# Altium PCB MergenSMPSBoardDesign.PcbDoc (part 1 of 3)
Units mm, origin at the board's own origin, x right, y up, seen from the top; angles counter-clockwise.
Board outline 115 x 90 mm, 4 copper layers (Top Layer, Layer 2, Layer 3, Bottom Layer), stack 1.527 mm thick; 83 components, 46 nets, 675 pads, 1118 vias.
Unrouted connection lines stored in the file: 1.
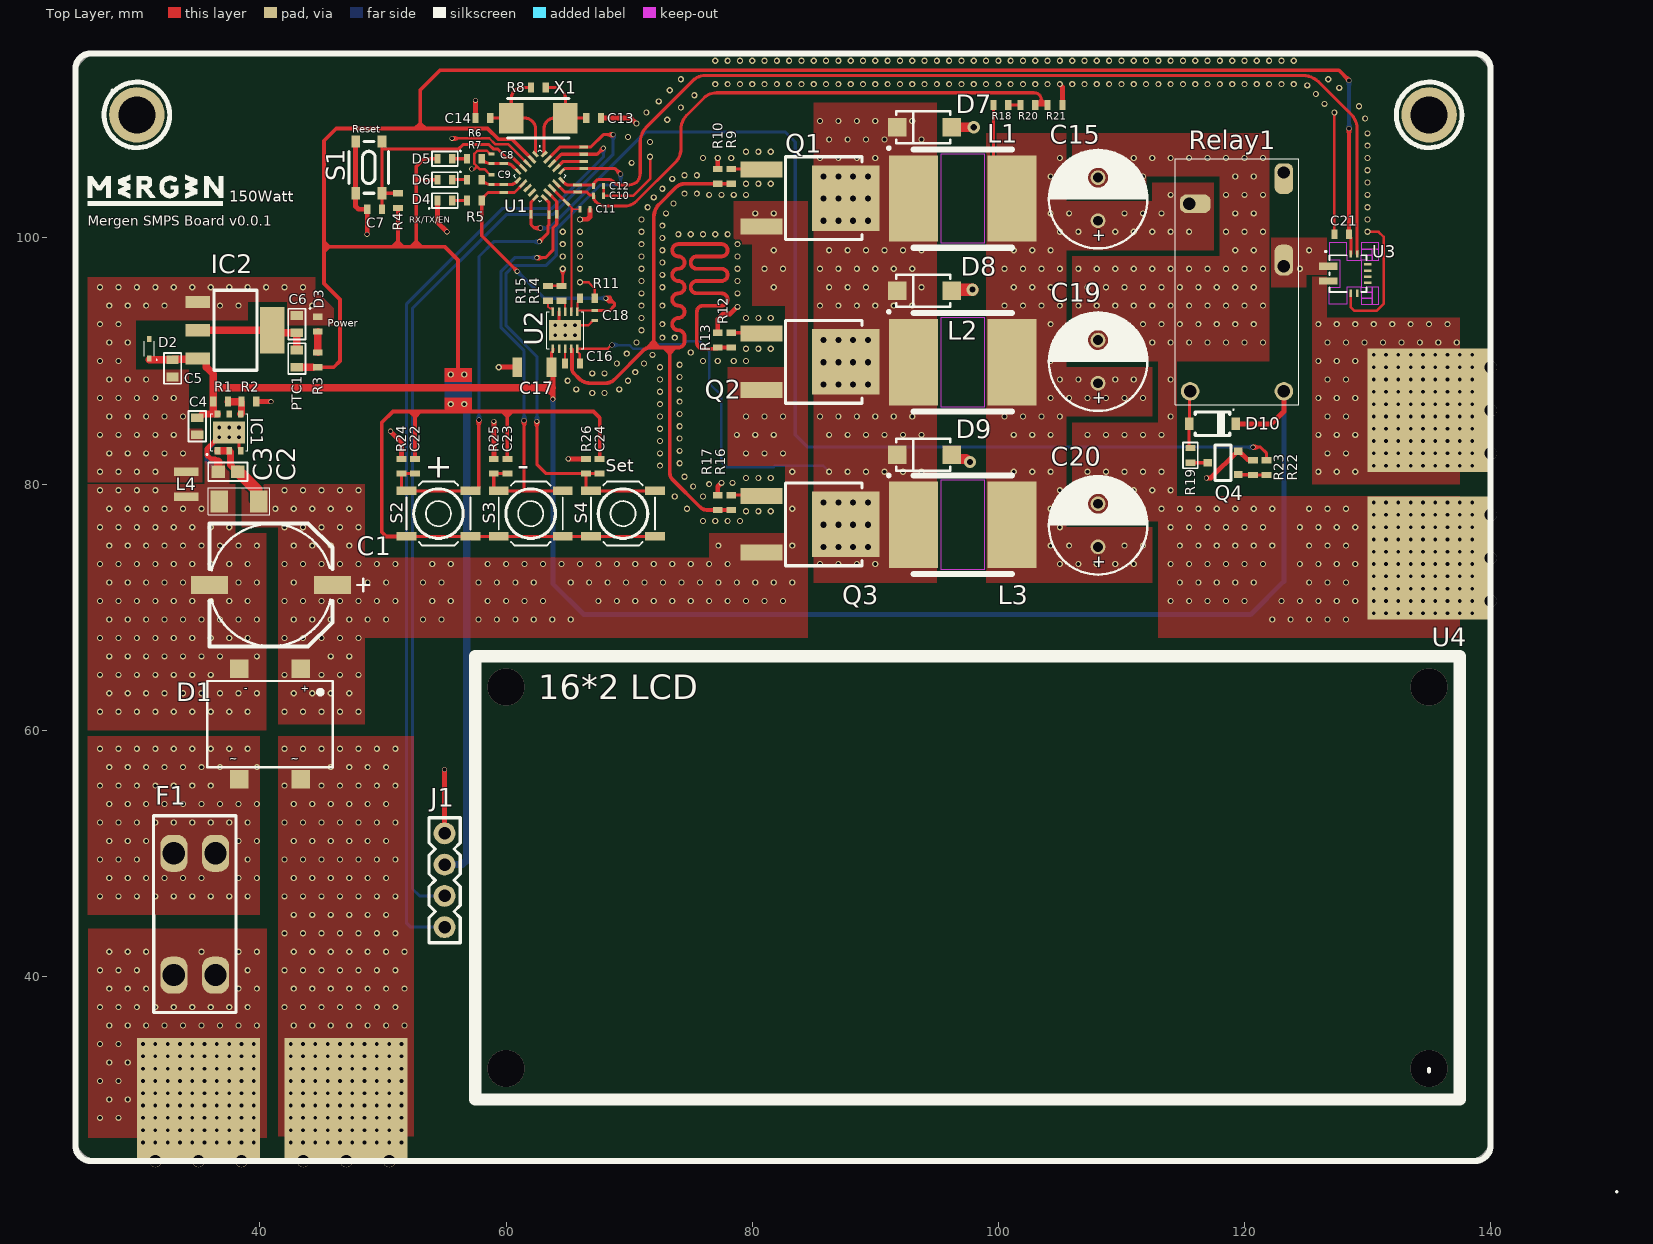
[diagram p0: Top Layer view]
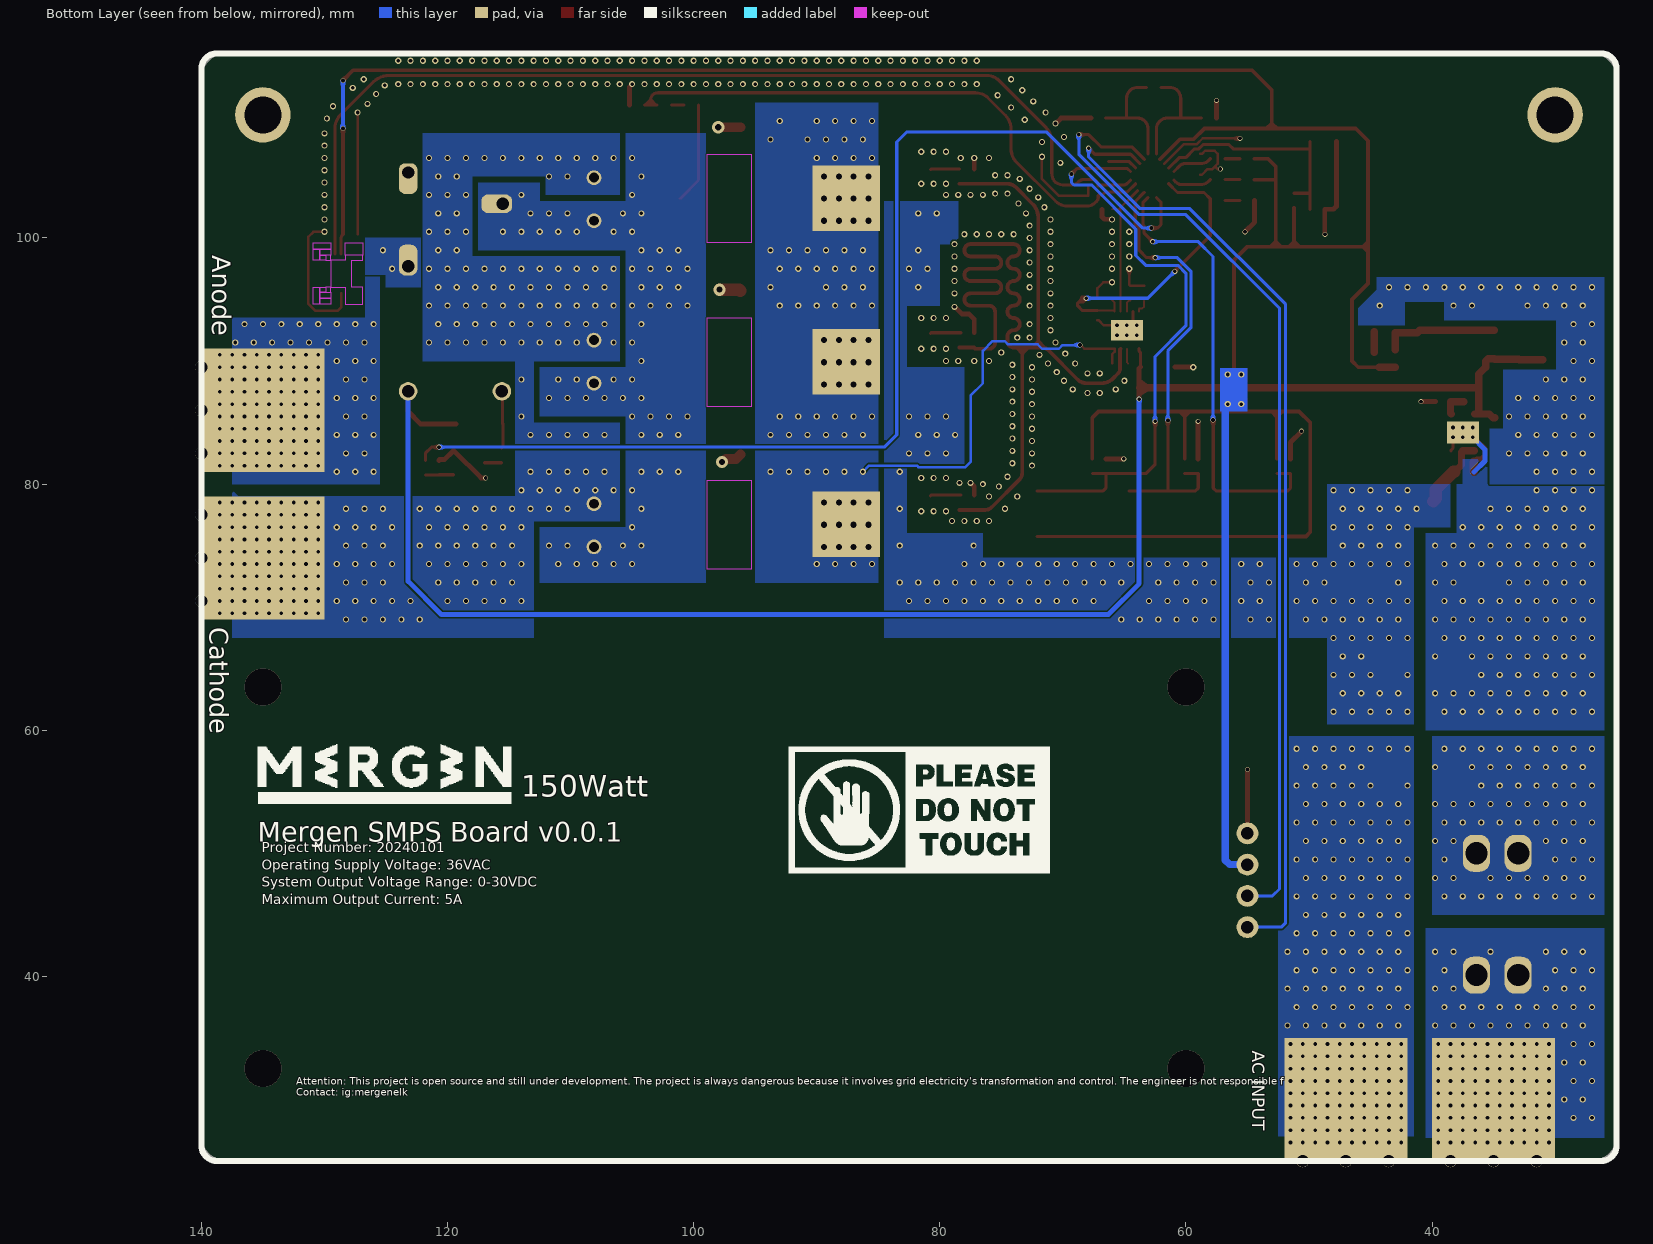
[diagram p1: Bottom Layer view, seen from below]
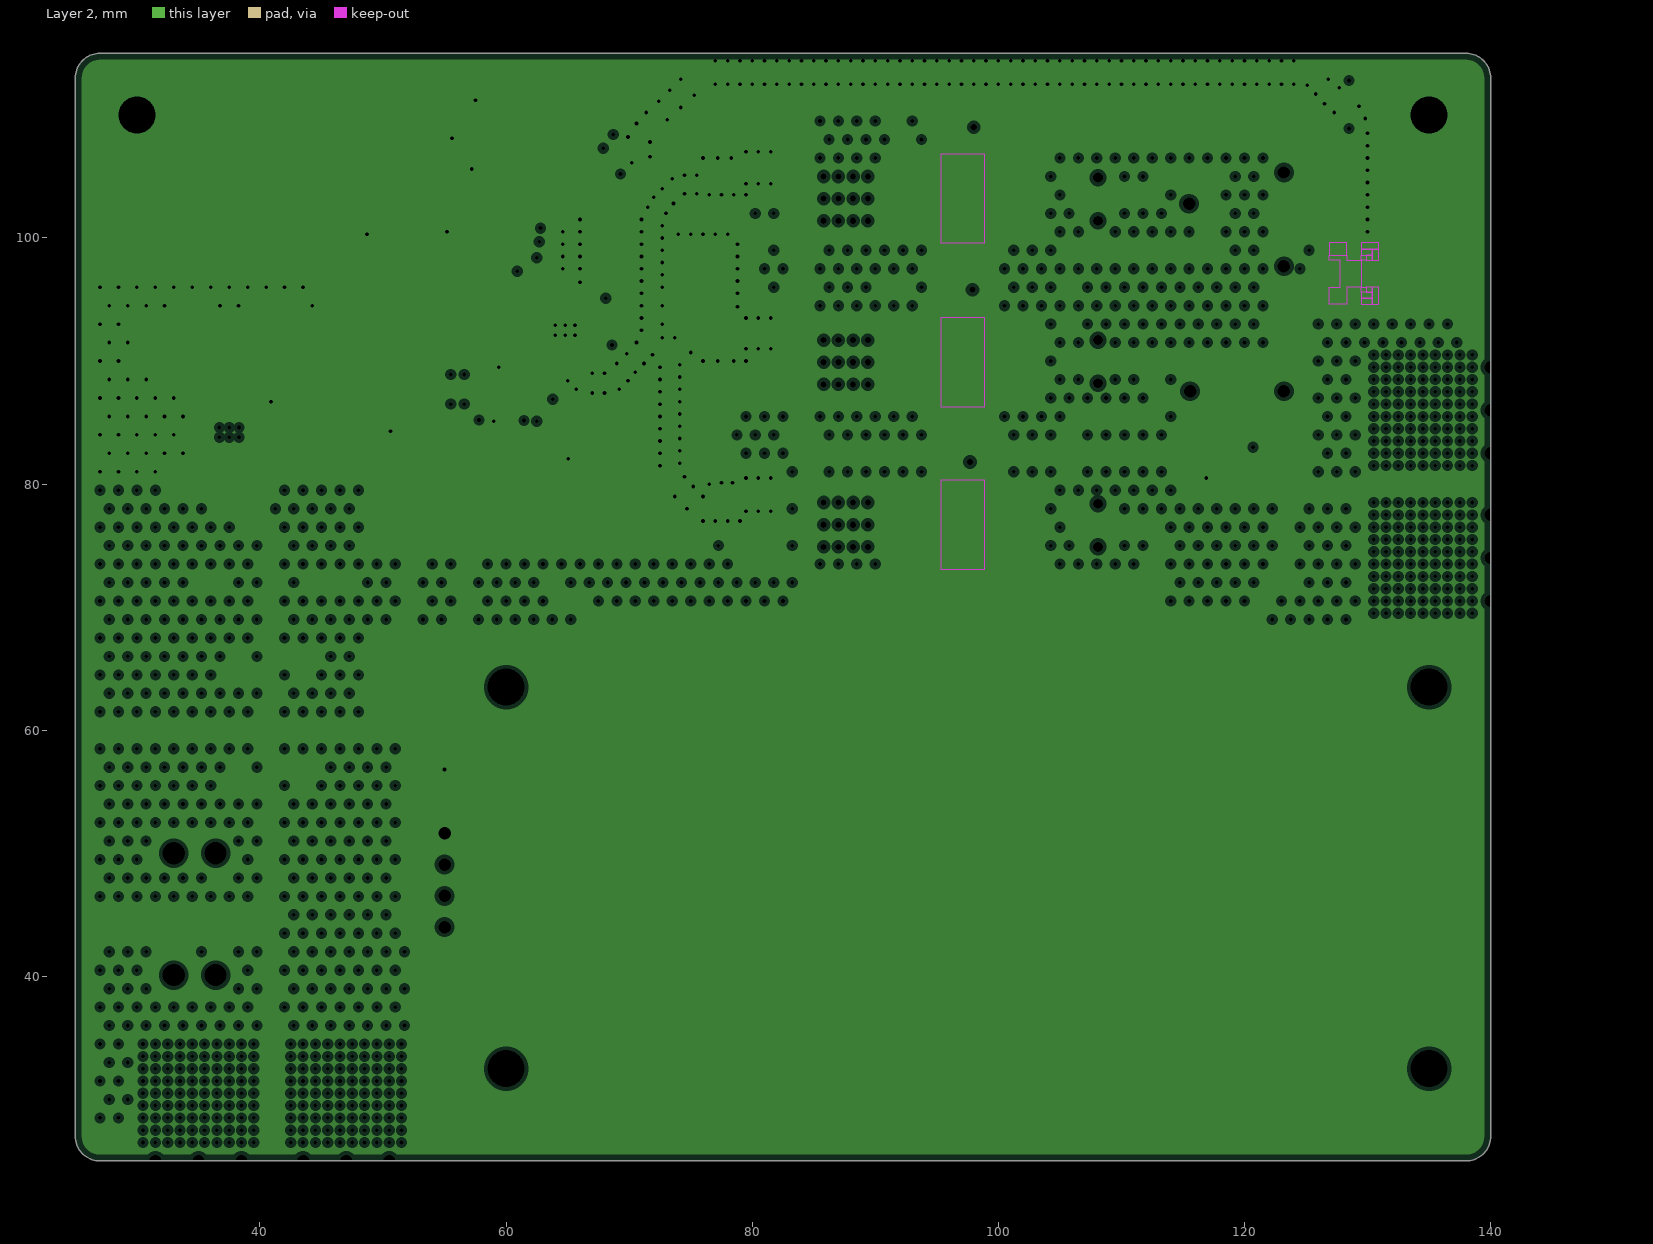
[diagram p2: Layer 2, clearances drawn from the general rule]
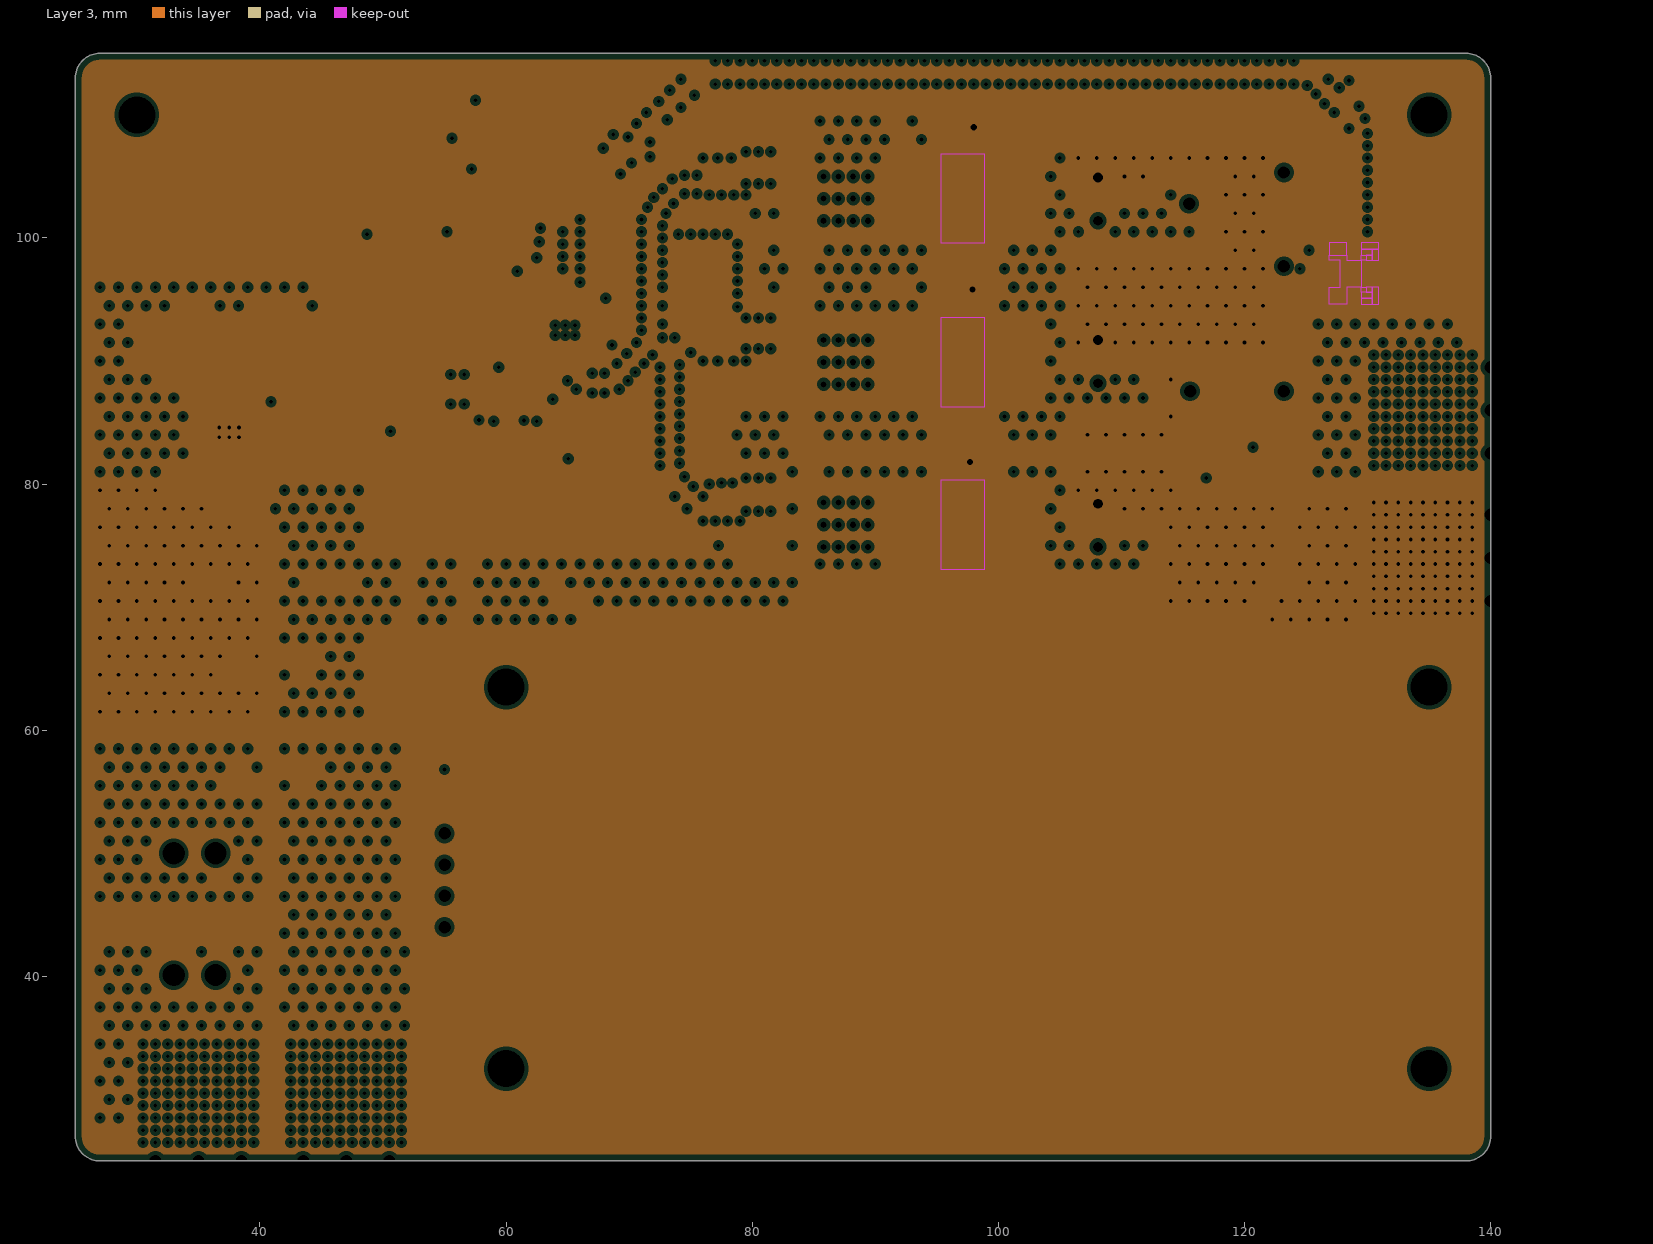
[diagram p3: Layer 3, clearances drawn from the general rule]
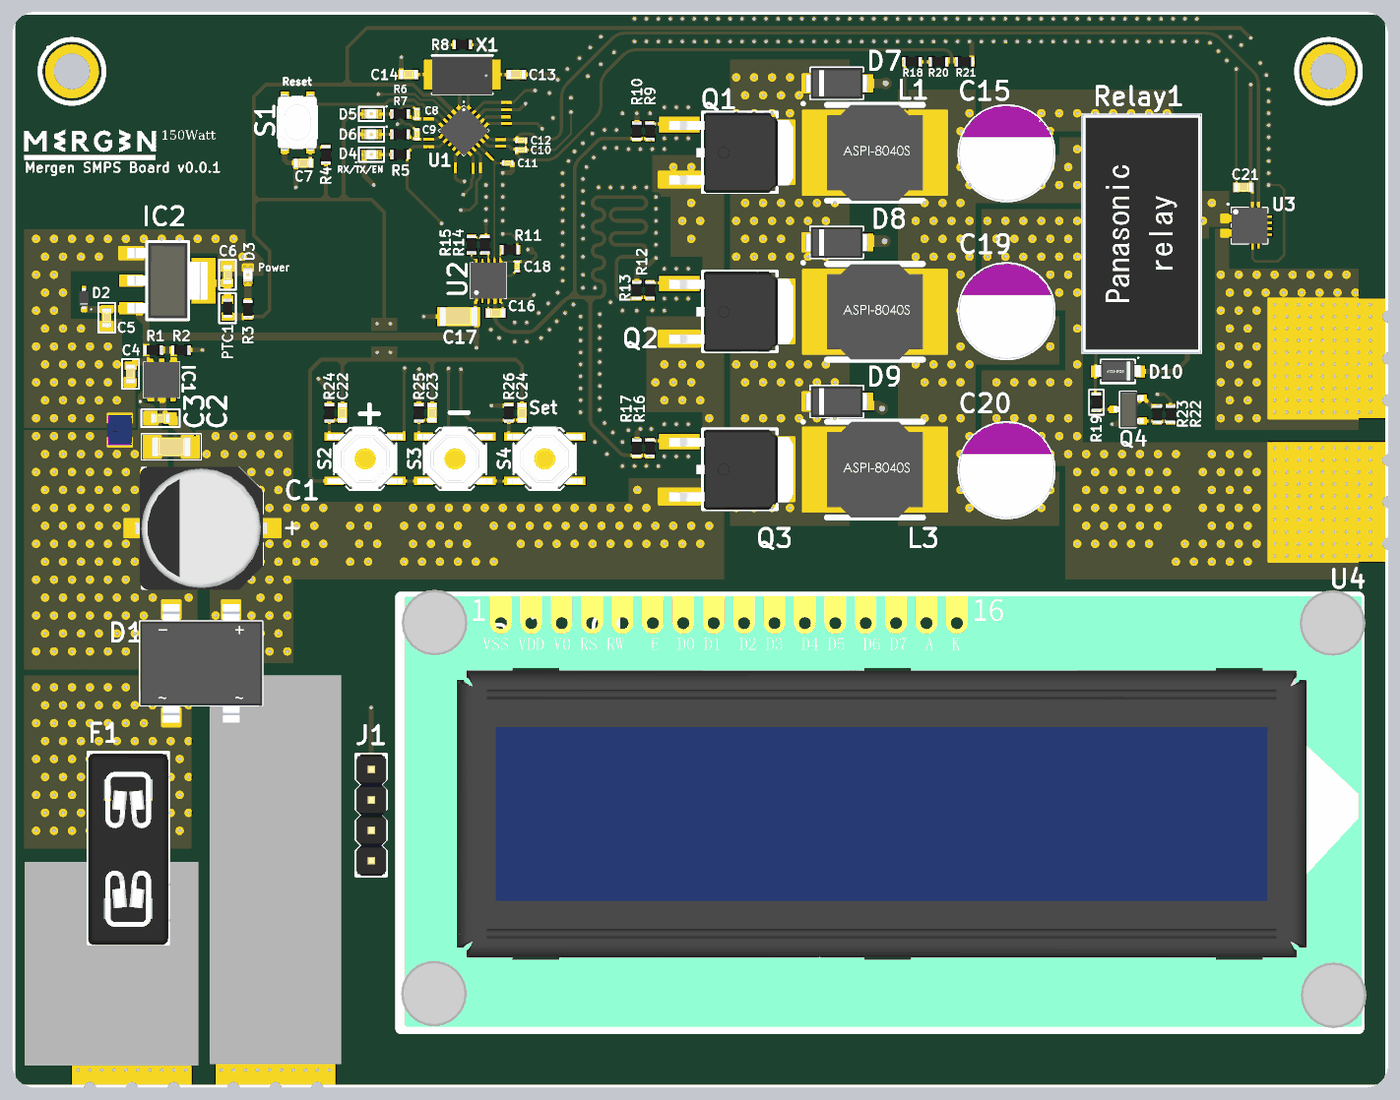
[diagram p6: 3D render of the assembled board from above, using the file's embedded part models]

## Layer stack, top to bottom
Top Solder: solder mask 0.0102, Solder Resist, Dk 3.5
Top Layer: signal copper 0.0175
Dielectric 2: prepreg 0.196, PP-006, Dk 4.1
Layer 2: plane copper 0.035, net DGND
Dielectric 1: dielectric 1.03, FR-4, Dk 4.8
Layer 3: plane copper 0.035, net PGND
Dielectric 3: prepreg 0.196, PP-006, Dk 4.1
Bottom Layer: signal copper 0.0175
Bottom Solder: solder mask 0.0102, Solder Resist, Dk 3.5

## Board outline
138,115 cw(c138,113) 140,113 140,27 cw(c138,27) 138,25 27,25 cw(c27,27) 25,27 25,113 cw(c27,113) 27,115

## Design rules (kind name [scope] priority, off if disabled: settings)
Clearance [All] p1: gap=0.152 ignorepadtopadclearanceinfootprint=TRUE except(0.102: Arc-Text Track-Text SMDPad-Text THPad-Text Via-Text Fill-Text Poly-Text Region-Text Text-Text Text-Hole)
DiffPairsRouting [All] p1: maxlimit=0.254 minlimit=0.152 mostfreqgap=0.203 toplayer_minwidth=0.152 toplayer_maxwidth=3.048 toplayer_prefwidth=0.254 bottomlayer_minwidth=0.152 bottomlayer_maxwidth=3.048 bottomlayer_prefwidth=0.254 maxuncoupledlength=12.7
HoleSize [All] p1: absolutevalues=TRUE maxlimit=6.35 minlimit=0.279 maxpercent=80.000 minpercent=20.000
HoleToHoleClearance [All] p1: gap=0.152 allowstackedmicrovias=TRUE
MinimumSolderMaskSliver MinimumSolderMaskSliver_UFQFPN20 [HasFootprint('MergenElektronik_Microcontrollers_STMicroelectronics_UFQFPN-20') vs HasFootprint('MergenElektronik_Microcontrollers_STMicroelectronics_UFQFPN-20')] p1: minsoldermaskwidth=0
MinimumSolderMaskSliver [All] p2: minsoldermaskwidth=0.076
PasteMaskExpansion [All] p1: expansion=-2539.975 usepaste=FALSE
PlaneClearance [All] p1: clearance=0.305
PlaneConnect [All] p1: planeconnectstyle=Relief reliefexpansion=0.254 reliefentries=4 reliefconductorwidth=0.254 reliefairgap=0.254
PolygonConnect PolygonConnect_49 [All vs IsNamedPolygon('CURRENT_OUT_L04_P032')] p1: connectstyle=Direct reliefconductorwidth=0.254 reliefentries=4 polygonreliefangle="90 Angle" airgapwidth=0.254
PolygonConnect PolygonConnect_48 [All vs IsNamedPolygon('RELAY_OUT_L04_P031')] p2: connectstyle=Direct reliefconductorwidth=0.254 reliefentries=4 polygonreliefangle="90 Angle" airgapwidth=0.254
PolygonConnect PolygonConnect_47 [All vs IsNamedPolygon('RELAY_OUT_L04_P031')] p3: connectstyle=Direct reliefconductorwidth=0.254 reliefentries=4 polygonreliefangle="90 Angle" airgapwidth=0.254
PolygonConnect PolygonConnect_46 [All vs IsNamedPolygon('PGND_L04_P030')] p4: connectstyle=Direct reliefconductorwidth=0.254 reliefentries=4 polygonreliefangle="90 Angle" airgapwidth=0.254
PolygonConnect PolygonConnect_45 [All vs IsNamedPolygon('PGND_L04_P029')] p5: connectstyle=Direct reliefconductorwidth=0.254 reliefentries=4 polygonreliefangle="90 Angle" airgapwidth=0.254
PolygonConnect PolygonConnect_44 [All vs IsNamedPolygon('HS_L04_P027')] p6: connectstyle=Direct reliefconductorwidth=0.254 reliefentries=4 polygonreliefangle="90 Angle" airgapwidth=0.254
PolygonConnect PolygonConnect_43 [All vs IsNamedPolygon('VCC_L04_P026')] p7: connectstyle=Direct reliefconductorwidth=0.254 reliefentries=4 polygonreliefangle="90 Angle" airgapwidth=0.254
PolygonConnect PolygonConnect_42 [All vs IsNamedPolygon('VCC_L04_P025')] p8: connectstyle=Direct reliefconductorwidth=0.254 reliefentries=4 polygonreliefangle="90 Angle" airgapwidth=0.254
PolygonConnect PolygonConnect_41 [All vs IsNamedPolygon('PGND_L04_P022')] p9: connectstyle=Direct reliefconductorwidth=0.254 reliefentries=4 polygonreliefangle="90 Angle" airgapwidth=0.254
PolygonConnect PolygonConnect_40 [All vs IsNamedPolygon('NETD1_3_L04_P021')] p10: connectstyle=Direct reliefconductorwidth=0.254 reliefentries=4 polygonreliefangle="90 Angle" airgapwidth=0.254
PolygonConnect PolygonConnect_39 [All vs IsNamedPolygon('NETD1_4_L04_P019')] p11: connectstyle=Direct reliefconductorwidth=0.254 reliefentries=4 polygonreliefangle="90 Angle" airgapwidth=0.254
PolygonConnect PolygonConnect_38 [All vs IsNamedPolygon('DGND_L04_P018')] p12: connectstyle=Direct reliefconductorwidth=0.254 reliefentries=4 polygonreliefangle="90 Angle" airgapwidth=0.254
PolygonConnect PolygonConnect_37 [All vs IsNamedPolygon('NETC15_ANOT_L04_P012')] p13: connectstyle=Direct reliefconductorwidth=0.254 reliefentries=4 polygonreliefangle="90 Angle" airgapwidth=0.254
PolygonConnect PolygonConnect_36 [All vs IsNamedPolygon('NETF1_1_L04_P003')] p14: connectstyle=Direct reliefconductorwidth=0.254 reliefentries=4 polygonreliefangle="90 Angle" airgapwidth=0.254
PolygonConnect PolygonConnect_35 [All vs IsNamedPolygon('NETD1_4_L01_P004')] p15: connectstyle=Direct reliefconductorwidth=0.254 reliefentries=4 polygonreliefangle="90 Angle" airgapwidth=0.254
PolygonConnect PolygonConnect_34 [All vs IsNamedPolygon('NETC15_ANOT_L01_P028')] p16: connectstyle=Direct reliefconductorwidth=0.254 reliefentries=4 polygonreliefangle="90 Angle" airgapwidth=0.254
PolygonConnect PolygonConnect_33 [All vs IsNamedPolygon('DGND_L01_P024')] p17: connectstyle=Direct reliefconductorwidth=0.254 reliefentries=4 polygonreliefangle="90 Angle" airgapwidth=0.254
PolygonConnect PolygonConnect_32 [All vs IsNamedPolygon('NETF1_1_L01_P020')] p18: connectstyle=Direct reliefconductorwidth=0.254 reliefentries=4 polygonreliefangle="90 Angle" airgapwidth=0.254
PolygonConnect PolygonConnect_31 [All vs IsNamedPolygon('PGND_L01_P017')] p19: connectstyle=Direct reliefconductorwidth=0.254 reliefentries=4 polygonreliefangle="90 Angle" airgapwidth=0.254
PolygonConnect PolygonConnect_30 [All vs IsNamedPolygon('CURRENT_OUT_L01_P016')] p20: connectstyle=Direct reliefconductorwidth=0.254 reliefentries=4 polygonreliefangle="90 Angle" airgapwidth=0.254
PolygonConnect PolygonConnect_29 [All vs IsNamedPolygon('RELAY_OUT_L01_P015')] p21: connectstyle=Direct reliefconductorwidth=0.254 reliefentries=4 polygonreliefangle="90 Angle" airgapwidth=0.254
PolygonConnect PolygonConnect_28 [All vs IsNamedPolygon('PGND_L01_P014')] p22: connectstyle=Direct reliefconductorwidth=0.254 reliefentries=4 polygonreliefangle="90 Angle" airgapwidth=0.254
PolygonConnect PolygonConnect_27 [All vs IsNamedPolygon('HS_L01_P011')] p23: connectstyle=Direct reliefconductorwidth=0.254 reliefentries=4 polygonreliefangle="90 Angle" airgapwidth=0.254
PolygonConnect PolygonConnect_26 [All vs IsNamedPolygon('VCC_L01_P010')] p24: connectstyle=Direct reliefconductorwidth=0.254 reliefentries=4 polygonreliefangle="90 Angle" airgapwidth=0.254
PolygonConnect PolygonConnect_25 [All vs IsNamedPolygon('VCC_L01_P009')] p25: connectstyle=Direct reliefconductorwidth=0.254 reliefentries=4 polygonreliefangle="90 Angle" airgapwidth=0.254
PolygonConnect PolygonConnect_24 [All vs IsNamedPolygon('PGND_L01_P008')] p26: connectstyle=Direct reliefconductorwidth=0.254 reliefentries=4 polygonreliefangle="90 Angle" airgapwidth=0.254
PolygonConnect PolygonConnect_23 [All vs IsNamedPolygon('NETD1_3_L01_P005')] p27: connectstyle=Direct reliefconductorwidth=0.254 reliefentries=4 polygonreliefangle="90 Angle" airgapwidth=0.254
PolygonConnect PolygonConnect_22 [All vs IsNamedPolygon('CURRENT_OUT_L01_P016')] p28: connectstyle=Direct reliefconductorwidth=0.254 reliefentries=4 polygonreliefangle="90 Angle" airgapwidth=0.254
PolygonConnect PolygonConnect_21 [All vs IsNamedPolygon('DGND_L04_P018')] p29: thpad.connectstyle=Relief thpad.reliefconductorwidth=0.6 thpad.reliefentries=4 thpad.polygonreliefangle="90 Angle" thpad.airgapwidth=0.254 smdpad.connectstyle=Relief smdpad.reliefconductorwidth=0.6 smdpad.reliefentries=4 smdpad.polygonreliefangle="90 Angle" smdpad.airgapwidth=0.254 via.connectstyle=Relief via.reliefconductorwidth=0.254 via.reliefentries=4 via.polygonreliefangle="90 Angle" via.airgapwidth=0.254
PolygonConnect PolygonConnect_20 [All vs IsNamedPolygon('PGND_L01_P017')] p30: thpad.connectstyle=Direct thpad.reliefconductorwidth=0.254 thpad.reliefentries=4 thpad.polygonreliefangle="90 Angle" thpad.airgapwidth=0.254 smdpad.connectstyle=Direct smdpad.reliefconductorwidth=0.254 smdpad.reliefentries=4 smdpad.polygonreliefangle="90 Angle" smdpad.airgapwidth=0.254 via.connectstyle=Relief via.reliefconductorwidth=0.254 via.reliefentries=4 via.polygonreliefangle="90 Angle" via.airgapwidth=0.254
PolygonConnect PolygonConnect_19 [All vs IsNamedPolygon('CURRENT_OUT_L01_P016')] p31: thpad.connectstyle=Direct thpad.reliefconductorwidth=0.254 thpad.reliefentries=4 thpad.polygonreliefangle="90 Angle" thpad.airgapwidth=0.254 smdpad.connectstyle=Direct smdpad.reliefconductorwidth=0.254 smdpad.reliefentries=4 smdpad.polygonreliefangle="90 Angle" smdpad.airgapwidth=0.254 via.connectstyle=Relief via.reliefconductorwidth=0.254 via.reliefentries=4 via.polygonreliefangle="90 Angle" via.airgapwidth=0.254
PolygonConnect PolygonConnect_18 [All vs IsNamedPolygon('RELAY_OUT_L01_P015')] p32: thpad.connectstyle=Direct thpad.reliefconductorwidth=0.254 thpad.reliefentries=4 thpad.polygonreliefangle="90 Angle" thpad.airgapwidth=0.254 smdpad.connectstyle=Direct smdpad.reliefconductorwidth=0.254 smdpad.reliefentries=4 smdpad.polygonreliefangle="90 Angle" smdpad.airgapwidth=0.254 via.connectstyle=Relief via.reliefconductorwidth=0.254 via.reliefentries=4 via.polygonreliefangle="90 Angle" via.airgapwidth=0.254
PolygonConnect PolygonConnect_17 [All vs IsNamedPolygon('PGND_L01_P014')] p33: thpad.connectstyle=Direct thpad.reliefconductorwidth=0.254 thpad.reliefentries=4 thpad.polygonreliefangle="90 Angle" thpad.airgapwidth=0.254 smdpad.connectstyle=Direct smdpad.reliefconductorwidth=0.254 smdpad.reliefentries=4 smdpad.polygonreliefangle="90 Angle" smdpad.airgapwidth=0.254 via.connectstyle=Relief via.reliefconductorwidth=0.254 via.reliefentries=4 via.polygonreliefangle="90 Angle" via.airgapwidth=0.254
PolygonConnect PolygonConnect_16 [All vs IsNamedPolygon('NETC15_ANOT_L04_P012')] p34: thpad.connectstyle=Direct thpad.reliefconductorwidth=0.254 thpad.reliefentries=4 thpad.polygonreliefangle="90 Angle" thpad.airgapwidth=0.254 smdpad.connectstyle=Direct smdpad.reliefconductorwidth=0.254 smdpad.reliefentries=4 smdpad.polygonreliefangle="90 Angle" smdpad.airgapwidth=0.254 via.connectstyle=Relief via.reliefconductorwidth=0.254 via.reliefentries=4 via.polygonreliefangle="90 Angle" via.airgapwidth=0.254
PolygonConnect PolygonConnect_15 [All vs IsNamedPolygon('HS_L01_P011')] p35: thpad.connectstyle=Direct thpad.reliefconductorwidth=0.254 thpad.reliefentries=4 thpad.polygonreliefangle="90 Angle" thpad.airgapwidth=0.254 smdpad.connectstyle=Direct smdpad.reliefconductorwidth=0.254 smdpad.reliefentries=4 smdpad.polygonreliefangle="90 Angle" smdpad.airgapwidth=0.254 via.connectstyle=Relief via.reliefconductorwidth=0.254 via.reliefentries=4 via.polygonreliefangle="90 Angle" via.airgapwidth=0.254
PolygonConnect PolygonConnect_14 [All vs IsNamedPolygon('VCC_L01_P010')] p36: thpad.connectstyle=Direct thpad.reliefconductorwidth=0.254 thpad.reliefentries=4 thpad.polygonreliefangle="90 Angle" thpad.airgapwidth=0.254 smdpad.connectstyle=Direct smdpad.reliefconductorwidth=0.254 smdpad.reliefentries=4 smdpad.polygonreliefangle="90 Angle" smdpad.airgapwidth=0.254 via.connectstyle=Relief via.reliefconductorwidth=0.254 via.reliefentries=4 via.polygonreliefangle="90 Angle" via.airgapwidth=0.254
PolygonConnect PolygonConnect_13 [All vs IsNamedPolygon('VCC_L01_P009')] p37: thpad.connectstyle=Relief thpad.reliefconductorwidth=0.6 thpad.reliefentries=4 thpad.polygonreliefangle="90 Angle" thpad.airgapwidth=0.254 smdpad.connectstyle=Relief smdpad.reliefconductorwidth=0.6 smdpad.reliefentries=4 smdpad.polygonreliefangle="90 Angle" smdpad.airgapwidth=0.254 via.connectstyle=Relief via.reliefconductorwidth=0.254 via.reliefentries=4 via.polygonreliefangle="90 Angle" via.airgapwidth=0.254
PolygonConnect PolygonConnect_12 [All vs IsNamedPolygon('PGND_L01_P008')] p38: thpad.connectstyle=Relief thpad.reliefconductorwidth=0.6 thpad.reliefentries=4 thpad.polygonreliefangle="90 Angle" thpad.airgapwidth=0.254 smdpad.connectstyle=Relief smdpad.reliefconductorwidth=0.6 smdpad.reliefentries=4 smdpad.polygonreliefangle="90 Angle" smdpad.airgapwidth=0.254 via.connectstyle=Relief via.reliefconductorwidth=0.254 via.reliefentries=4 via.polygonreliefangle="90 Angle" via.airgapwidth=0.254
PolygonConnect PolygonConnect_11 [All vs IsNamedPolygon('NETD1_3_L01_P005')] p39: thpad.connectstyle=Direct thpad.reliefconductorwidth=0.254 thpad.reliefentries=4 thpad.polygonreliefangle="90 Angle" thpad.airgapwidth=0.254 smdpad.connectstyle=Direct smdpad.reliefconductorwidth=0.254 smdpad.reliefentries=4 smdpad.polygonreliefangle="90 Angle" smdpad.airgapwidth=0.254 via.connectstyle=Relief via.reliefconductorwidth=0.254 via.reliefentries=4 via.polygonreliefangle="90 Angle" via.airgapwidth=0.254
PolygonConnect PolygonConnect_10 [All vs IsNamedPolygon('NETD1_4_L01_P004')] p40: thpad.connectstyle=Direct thpad.reliefconductorwidth=0.254 thpad.reliefentries=4 thpad.polygonreliefangle="90 Angle" thpad.airgapwidth=0.254 smdpad.connectstyle=Direct smdpad.reliefconductorwidth=0.254 smdpad.reliefentries=4 smdpad.polygonreliefangle="90 Angle" smdpad.airgapwidth=0.254 via.connectstyle=Relief via.reliefconductorwidth=0.254 via.reliefentries=4 via.polygonreliefangle="90 Angle" via.airgapwidth=0.254
PolygonConnect PolygonConnect_9 [All vs IsNamedPolygon('CURRENT_OUT_L01_P016')] p41: thpad.connectstyle=Direct thpad.reliefconductorwidth=0.254 thpad.reliefentries=4 thpad.polygonreliefangle="90 Angle" thpad.airgapwidth=0.254 smdpad.connectstyle=Direct smdpad.reliefconductorwidth=0.254 smdpad.reliefentries=4 smdpad.polygonreliefangle="90 Angle" smdpad.airgapwidth=0.254 via.connectstyle=Relief via.reliefconductorwidth=0.254 via.reliefentries=4 via.polygonreliefangle="90 Angle" via.airgapwidth=0.254
PolygonConnect PolygonConnect_8 [All vs IsNamedPolygon('NETF1_1_L04_P003')] p42: thpad.connectstyle=Relief thpad.reliefconductorwidth=1 thpad.reliefentries=4 thpad.polygonreliefangle="90 Angle" thpad.airgapwidth=0.254 smdpad.connectstyle=Relief smdpad.reliefconductorwidth=1 smdpad.reliefentries=4 smdpad.polygonreliefangle="90 Angle" smdpad.airgapwidth=0.254 via.connectstyle=Relief via.reliefconductorwidth=0.254 via.reliefentries=4 via.polygonreliefangle="90 Angle" via.airgapwidth=0.254
PolygonConnect PolygonConnect_7 [All vs IsNamedPolygon('NETD1_4_L01_P004')] p43: thpad.connectstyle=Relief thpad.reliefconductorwidth=1 thpad.reliefentries=4 thpad.polygonreliefangle="90 Angle" thpad.airgapwidth=0.254 smdpad.connectstyle=Relief smdpad.reliefconductorwidth=1 smdpad.reliefentries=4 smdpad.polygonreliefangle="90 Angle" smdpad.airgapwidth=0.254 via.connectstyle=Relief via.reliefconductorwidth=0.254 via.reliefentries=4 via.polygonreliefangle="90 Angle" via.airgapwidth=0.254
PolygonConnect PolygonConnect_6 [All vs IsNamedPolygon('NETD1_3_L01_P005')] p44: thpad.connectstyle=Relief thpad.reliefconductorwidth=1 thpad.reliefentries=4 thpad.polygonreliefangle="90 Angle" thpad.airgapwidth=0.254 smdpad.connectstyle=Relief smdpad.reliefconductorwidth=1 smdpad.reliefentries=4 smdpad.polygonreliefangle="90 Angle" smdpad.airgapwidth=0.254 via.connectstyle=Relief via.reliefconductorwidth=0.254 via.reliefentries=4 via.polygonreliefangle="90 Angle" via.airgapwidth=0.254
PolygonConnect PolygonConnect_5 [All vs IsNamedPolygon('VCC_L01_P009')] p45: thpad.connectstyle=Relief thpad.reliefconductorwidth=0.4 thpad.reliefentries=4 thpad.polygonreliefangle="90 Angle" thpad.airgapwidth=0.254 smdpad.connectstyle=Relief smdpad.reliefconductorwidth=0.4 smdpad.reliefentries=4 smdpad.polygonreliefangle="90 Angle" smdpad.airgapwidth=0.254 via.connectstyle=Relief via.reliefconductorwidth=0.254 via.reliefentries=4 via.polygonreliefangle="90 Angle" via.airgapwidth=0.254
PolygonConnect PolygonConnect_4 [All vs IsNamedPolygon('PGND_L01_P008')] p46: thpad.connectstyle=Relief thpad.reliefconductorwidth=0.4 thpad.reliefentries=4 thpad.polygonreliefangle="90 Angle" thpad.airgapwidth=0.254 smdpad.connectstyle=Relief smdpad.reliefconductorwidth=0.4 smdpad.reliefentries=4 smdpad.polygonreliefangle="90 Angle" smdpad.airgapwidth=0.254 via.connectstyle=Relief via.reliefconductorwidth=0.254 via.reliefentries=4 via.polygonreliefangle="90 Angle" via.airgapwidth=0.254
PolygonConnect PolygonConnect_3 [All vs IsNamedPolygon('NETD1_3_L01_P005')] p47: thpad.connectstyle=Relief thpad.reliefconductorwidth=0.6 thpad.reliefentries=4 thpad.polygonreliefangle="90 Angle" thpad.airgapwidth=0.254 smdpad.connectstyle=Relief smdpad.reliefconductorwidth=0.6 smdpad.reliefentries=4 smdpad.polygonreliefangle="90 Angle" smdpad.airgapwidth=0.254 via.connectstyle=Relief via.reliefconductorwidth=0.254 via.reliefentries=4 via.polygonreliefangle="90 Angle" via.airgapwidth=0.254
PolygonConnect PolygonConnect_2 [All vs IsNamedPolygon('NETD1_4_L01_P004')] p48: thpad.connectstyle=Relief thpad.reliefconductorwidth=0.6 thpad.reliefentries=4 thpad.polygonreliefangle="90 Angle" thpad.airgapwidth=0.254 smdpad.connectstyle=Relief smdpad.reliefconductorwidth=0.6 smdpad.reliefentries=4 smdpad.polygonreliefangle="90 Angle" smdpad.airgapwidth=0.254 via.connectstyle=Relief via.reliefconductorwidth=0.254 via.reliefentries=4 via.polygonreliefangle="90 Angle" via.airgapwidth=0.254
PolygonConnect PolygonConnect_1 [All vs IsNamedPolygon('NETF1_1_L04_P003')] p49: thpad.connectstyle=Relief thpad.reliefconductorwidth=0.6 thpad.reliefentries=4 thpad.polygonreliefangle="90 Angle" thpad.airgapwidth=0.254 smdpad.connectstyle=Relief smdpad.reliefconductorwidth=0.6 smdpad.reliefentries=4 smdpad.polygonreliefangle="90 Angle" smdpad.airgapwidth=0.254 via.connectstyle=Relief via.reliefconductorwidth=0.254 via.reliefentries=4 via.polygonreliefangle="90 Angle" via.airgapwidth=0.254
PolygonConnect [All] p50: connectstyle=Relief reliefconductorwidth=0.254 reliefentries=4 polygonreliefangle="90 Angle" airgapwidth=0.254
RoutingCorners [All] p1: cornerstyle=45-Degree minsetback=1.016 maxsetback=1.016
RoutingTopology [All] p1: topology=Daisy_Balanced
RoutingVias [All] p1: holewidth=0.305 width=0.406 viastyle="Through Hole" minholewidth=0.279 minwidth=0.406 maxholewidth=6.35 maxwidth=8.128
SilkToSilkClearance [All] p1: silktosilkclearance=0.076
SilkToSolderMaskClearance [IsPad] p1: minsilkscreentomaskgap=0.076 clearancetoexposedcopper=TRUE
SolderMaskExpansion [All] p1: expansion=0.102 istentingtop=FALSE
SupplyNets "Schematic Supply Nets_6" [InNet('PGND')] p1: voltage=0.000
SupplyNets "Schematic Supply Nets_5" [InNet('3.3V')] p2: voltage=0.000
SupplyNets "Schematic Supply Nets_4" [InNet('USB5V')] p3: voltage=0.000
SupplyNets "Schematic Supply Nets_3" [InNet('DGND')] p4: voltage=0.000
SupplyNets "Schematic Supply Nets_2" [InNet('7.5V')] p5: voltage=0.000
SupplyNets "Schematic Supply Nets_1" [InNet('VCC')] p6: voltage=0.000
Width [All] p1: maxlimit=5.08 minlimit=0.152 preferedwidth=0.254 minimp=50.000000 maximp=50.000000 favimp=50.000000
19 further rules are at their usual default settings.

## Classes and differential pairs
component class PowerDistribution: C1 C2 C3 C4 C5 C6 D1 D2 D3 F1 IC1 IC2 L4 PTC1 R1 R2 R3
component class MicroController: C7 C8 C9 C10 C11 C12 C13 C14 D4 D5 D6 R4 R5 R6 R7 R8 S1 U1 X1
component class Measuring: C21 D10 Q4 R18 R19 R20 R21 R22 R23 Relay1 U3
component class GateDriverandMosfets: C15 C16 C17 C18 C19 C20 D7 D8 D9 L1 L2 L3 Q1 Q2 Q3 R9 R10 R11 R12 R13 R14 R15 R16 R17 U2
component class Control: C22 C23 C24 J1 R24 R25 R26 S2 S3 S4 U4

## Components (designator, comment, footprint, x,y, rotation, side; value= is the part's Value field where it differs from the comment)
C1 "100 µF" MergenElektronik_Capacitors_AluminumElectrolytics_SMDs_10x10.5mm 35.9,66.8 r0 top
C2 "0.33 µF" MergenElektronik_Capacitors_Ceramics_SMDs_1206_L 39.9,79.4 r180 top
C3 "10 nF" MergenElektronik_Capacitors_Ceramics_SMDs_0603_L 37.4,81 r180 top
C4 "100 nF" MergenElektronik_Capacitors_Ceramics_SMDs_0603_M 34.9,84.7 r270 top
C5 "100 nF" MergenElektronik_Capacitors_Ceramics_SMDs_0603_M 32.9,89.4 r270 top
C6 "100 nF" MergenElektronik_Capacitors_Ceramics_SMDs_0603_M 43,93 r90 top
C7 "100 nF" MergenElektronik_Capacitors_Ceramics_SMDs_0603_S_NS 49.318,102.336 r180 top
C8 "50 pF" MergenElektronik_Capacitors_Ceramics_SMDs_0402_S_NS 58.818,106.436 r90 top
C9 "50 pF" MergenElektronik_Capacitors_Ceramics_SMDs_0402_S_NS 58.818,104.736 r90 top
C10 "50 pF" MergenElektronik_Capacitors_Ceramics_SMDs_0402_S_NS 67.518,103.436 r0 top
C11 "50 pF" MergenElektronik_Capacitors_Ceramics_SMDs_0402_S_NS 66.418,102.336 r0 top
C12 "50 pF" MergenElektronik_Capacitors_Ceramics_SMDs_0402_S_NS 67.518,104.236 r0 top
C13 "8 pF" MergenElektronik_Capacitors_Ceramics_SMDs_0603_S_NS 67.118,109.736 r0 top
C14 "8 pF" MergenElektronik_Capacitors_Ceramics_SMDs_0603_S_NS 58.118,109.736 r180 top
C15 "18 µF" MERGENELEKTRONIK_CAPACITORS_ALUMINUMELECTROLYTICS_THTS_8X7MM 112.1,99.15 r90 top
C16 "100 nF" MergenElektronik_Capacitors_Ceramics_SMDs_0603_S_NS 65.4,89.8 r0 top
C17 "1 µF" MergenElektronik_Capacitors_Ceramics_SMDs_1206_S_NS 63.9,90.3 r180 top
C18 "1 nF" MergenElektronik_Capacitors_Ceramics_SMDs_0402_S_NS 67.2,93.7 r270 top
C19 "18 µF" MERGENELEKTRONIK_CAPACITORS_ALUMINUMELECTROLYTICS_THTS_8X7MM 112.1,85.95 r90 top
C20 "18 µF" MERGENELEKTRONIK_CAPACITORS_ALUMINUMELECTROLYTICS_THTS_8X7MM 112.1,72.65 r90 top
C21 "100 nF" MergenElektronik_Capacitors_Ceramics_SMDs_0603_S_NS 127.9,100.3 r180 top
C22 "100 nF" MergenElektronik_Capacitors_Ceramics_SMDs_0603_S_NS 52.6,81.45 r270 top
C23 "100 nF" MergenElektronik_Capacitors_Ceramics_SMDs_0603_S_NS 60.1,81.45 r270 top
C24 "100 nF" MergenElektronik_Capacitors_Ceramics_SMDs_0603_S_NS 67.6,81.45 r270 top
D1 "TBS606" MergenElektronik_Diodes_BridgeRectifiers_TBS606 35.7,57 r0 top
D2 "BAT54XV2T1G" MergenElektronik_Diodes_SchottkyDiodes_SOD-523 30.6,91.6 r270 top value=VSSB7L45-M3/52T
D3 "Red" MergenElektronik_Leds_SMDs_0603_S_NS 44.7,93 r90 top
D4 "Red" MergenElektronik_Leds_SMDs_0603_S 55.018,103.036 r180 top
D5 "Green" MergenElektronik_Leds_SMDs_0603_S 55.018,106.436 r0 top
D6 "Green" MergenElektronik_Leds_SMDs_0603_S 55.018,104.736 r0 top
D7 "SL310A-TP" "MergenElektronik_Diodes_SchottkyDiodes_DO-214AC (SMA)" 96.1,110.3 r180 top value=VSSB7L45-M3/52T
D8 "SL310A-TP" "MergenElektronik_Diodes_SchottkyDiodes_DO-214AC (SMA)" 96.1,97 r180 top value=VSSB7L45-M3/52T
D9 "SL310A-TP" "MergenElektronik_Diodes_SchottkyDiodes_DO-214AC (SMA)" 96.1,83.7 r180 top value=VSSB7L45-M3/52T
D10 "1N4007FL" MergenElektronik_Diodes_SingleDiodes_SOD-123F 116,83.95 r0 top
F1 "3568" MergenElektronik_FuseHolders_BladeType_3568 38.065,37.05 r90 top
IC1 "MAX5084ATT+T" MergenElektronik_Regulators_Linears_6-TDFN 39,82.7 r90 top
IC2 "NCP1117 - 3v3" MergenElektronik_Regulators_Linears_SOT223 36.25,95.75 r270 top value=NCP1117ST33T3G
J1 "1x4" MergenElektronik_Connectors_Headers_1x4_Male 55,44 r90 top
L1 "75 µH" MergenElektronik_Inductors_PowerInductors_SMDs_8x8x4mm_Shielded 93.1,99.2 r0 top
L2 "75 µH" MergenElektronik_Inductors_PowerInductors_SMDs_8x8x4mm_Shielded 93.1,85.9 r0 top
L3 "75 µH" MergenElektronik_Inductors_PowerInductors_SMDs_8x8x4mm_Shielded 93.1,72.7 r0 top
L4 "2.2  µH" MergenElektronik_Inductors_PowerInductors_SMDs_1008_S_NS 34,80 r90 top
PTC1 "0ZCK0020FF2G" MergenElektronik_CircuitProtections_PTCs_0603_M 43,90.2 r270 top
Q1 "DMN10H220LK3-13" MergenElektronik_Transistors_Mosfets_TO-252-3(DPAK) 82.7,106.6 r270 top
Q2 "DMN10H220LK3-13" MergenElektronik_Transistors_Mosfets_TO-252-3(DPAK) 82.7,93.3 r270 top
Q3 "DMN10H220LK3-13" MergenElektronik_Transistors_Mosfets_TO-252-3(DPAK) 82.7,80.1 r270 top
Q4 "BSS138LT1G" MergenElektronik_Transistors_Mosfets_SOT-23 118.9,80.283 r90 top
R1 "10K" MergenElektronik_Resistors_ChipResistors_0603_S_NS 36.8,86.7 r180 top value="Chip Resistor - 0603 - 10K"
R2 "2K" MergenElektronik_Resistors_ChipResistors_0603_S_NS 39.1,86.7 r180 top value="Chip Resistor - 0603 - 2K"
R3 "330" MergenElektronik_Resistors_ChipResistors_0603_S_NS 44.7,90.1 r90 top value="Chip Resistor - 0603 - 330R"
R4 "40K" MergenElektronik_Resistors_ChipResistors_0603_S_NS 51.218,103.036 r90 top value="Chip Resistor - 0603 - 40K"
R5 "330" MergenElektronik_Resistors_ChipResistors_0603_S_NS 57.418,103.036 r0 top value="Chip Resistor - 0603 - 330R"
R6 "330" MergenElektronik_Resistors_ChipResistors_0603_S_NS 57.418,106.436 r0 top value="Chip Resistor - 0603 - 330R"
R7 "330" MergenElektronik_Resistors_ChipResistors_0603_S_NS 57.418,104.736 r0 top value="Chip Resistor - 0603 - 330R"
R8 "200K" MergenElektronik_Resistors_ChipResistors_0603_S_NS 62.618,112.236 r180 top value="Chip Resistor - 0603 - 200K"
R9 "330" MergenElektronik_Resistors_ChipResistors_0603_S_NS 78.3,105 r90 top value="Chip Resistor - 0603 - 330R"
R10 "1K" MergenElektronik_Resistors_ChipResistors_0603_S_NS 77.2,105 r270 top value="Chip Resistor - 0603 - 1K"
R11 "10K" MergenElektronik_Resistors_ChipResistors_0603_S_NS 66.6,95.1 r0 top value="Chip Resistor - 0603 - 10K"
R12 "330" MergenElektronik_Resistors_ChipResistors_0603_S_NS 78.3,91.7 r90 top value="Chip Resistor - 0603 - 330R"
R13 "1K" MergenElektronik_Resistors_ChipResistors_0603_S_NS 77.2,91.7 r270 top value="Chip Resistor - 0603 - 1K"
R14 "10K" MergenElektronik_Resistors_ChipResistors_0603_S_NS 64.5,95.5 r90 top value="Chip Resistor - 0603 - 10K"
R15 "10K" MergenElektronik_Resistors_ChipResistors_0603_S_NS 63.4,95.5 r90 top value="Chip Resistor - 0603 - 10K"
R16 "330" MergenElektronik_Resistors_ChipResistors_0603_S_NS 78.3,78.5 r90 top value="Chip Resistor - 0603 - 330R"
R17 "1K" MergenElektronik_Resistors_ChipResistors_0603_S_NS 77.2,78.5 r270 top value="Chip Resistor - 0603 - 1K"
R18 "40K" MergenElektronik_Resistors_ChipResistors_0603_S_NS 100.2,110.8 r0 top value="Chip Resistor - 0603 - 40K"
R19 "22" MergenElektronik_Resistors_ChipResistors_0603_S 115.6,82.333 r90 top value="Chip Resistor - 0603 - 22"
R20 "6.65K" MergenElektronik_Resistors_ChipResistors_0603_S_NS 102.4,110.8 r0 top value="Chip Resistor - 0603 - 6.65K"
R21 "3.3K" MergenElektronik_Resistors_ChipResistors_0603_S_NS 104.6,110.8 r0 top value="Chip Resistor - 0603 - 3.3K"
R22 "330" MergenElektronik_Resistors_ChipResistors_0603_S_NS 121.8,81.333 r270 top value="Chip Resistor - 0603 - 330R"
R23 "10K" MergenElektronik_Resistors_ChipResistors_0603_S_NS 120.7,81.333 r270 top value="Chip Resistor - 0603 - 10K"
R24 "10K" MergenElektronik_Resistors_ChipResistors_0603_S_NS 51.5,81.45 r90 top value="Chip Resistor - 0603 - 10K"
R25 "10K" MergenElektronik_Resistors_ChipResistors_0603_S_NS 59,81.45 r90 top value="Chip Resistor - 0603 - 10K"
R26 "10K" MergenElektronik_Resistors_ChipResistors_0603_S_NS 66.5,81.45 r90 top value="Chip Resistor - 0603 - 10K"
Relay1 "ALQ105" MergenElektronik_Relays_PowerRelays_ALQ105 114.39,86.43 r0 top
S1 "PTS815-SJM" MergenElektronik_Switches_TactileSwitches_PTS815 50.443,103.636 r90 top
S2 "PTS526 SK15 SMTR2 LFS" MergenElektronik_Switches_TactileSwitches_PTS526 51.9,75 r0 top
S3 "PTS526 SK15 SMTR2 LFS" MergenElektronik_Switches_TactileSwitches_PTS526 59.4,75 r0 top
S4 "PTS526 SK15 SMTR2 LFS" MergenElektronik_Switches_TactileSwitches_PTS526 66.9,75 r0 top
U1 "STM32C011F6U6TR" MergenElektronik_Microcontrollers_STMicroelectronics_UFQFPN-20 60.618,105.046 r315 top
U2 "UCC27282DRCT" MergenElektronik_Logics_GateDrivers_10VSON 66.3,91 r90 top
U3 "ACS711KEXLT-31AB-T" MergenElektronik_Sensors_CurrentSensors_ACS711KEXLT-31AB-T 126.9,95.6 r0 top
U4 "16*2 LCD Module" MergenElektronik_Screens_LCDs_16x2Module 57.5,30 r0 top
X1 "48 MHz" MergenElektronik_Oscillators_Crystals_2-SMD 65.118,111.336 r180 top value="12 MHz"

## Footprints (in the part's own frame and the unit in brackets; to place one, negate y for a bottom-side part, rotate by r counter-clockwise, add the part's x,y. Pads: shape width x height; smd on the part's side, far side on the other; paste and mask are expansions set on the pad)
MergenElektronik_Capacitors_AluminumElectrolytics_SMDs_10x10.5mm [mm] "10mm Diameter 10.5mm Height"
  rect 3x1.5 smd: 1(0,5) 2(10,5)
  silkscreen extent 0,0 13,10, body extent -0.6,-0.15 10.4,10.15, height 10.64
MERGENELEKTRONIK_CAPACITORS_ALUMINUMELECTROLYTICS_THTS_8X7MM [mm] "8MM Diameter - 7MM Height"
  round 1.2 hole 0.8: ANOT(2.25,4) KATOT(5.75,4)
  silkscreen extent 0,0 8,8, body extent 0,0 8,8, height 7
MergenElektronik_Capacitors_Ceramics_SMDs_0402_S_NS [mm] "0402 Small - No Silkscreen"
  rect 0.25x0.5 smd: 1(-0.4,0) 2(0.4,0)
  body extent -0.5,-0.25 0.5,0.25, height 0.45
MergenElektronik_Capacitors_Ceramics_SMDs_0603_L [mm] "0603 Large"
  rect 1.1x1 smd: 1(-0.8,0) 2(0.8,0)
  silkscreen extent -1.6,-0.75 1.6,0.75, body extent -0.8,-0.4 0.8,0.4, height 0.85
MergenElektronik_Capacitors_Ceramics_SMDs_0603_M [mm] "0603 Medium"
  rect 0.7x1 smd: 1(-0.7,0) 2(0.7,0)
  silkscreen extent -1.25,-0.7 1.25,0.7, body extent -0.8,-0.4 0.8,0.4, height 0.85
MergenElektronik_Capacitors_Ceramics_SMDs_0603_S_NS [mm] "0603 Small - No Silkscreen"
  rect 0.5x0.8 smd: 1(-0.6,0) 2(0.6,0)
  body extent -0.8,-0.4 0.8,0.4, height 0.85
MergenElektronik_Capacitors_Ceramics_SMDs_1206_L [mm] "1206 Large"
  rect 1.4x1.8 smd: 1(0,0.8) 2(3.2,0.8)
  silkscreen extent -0.9,-0.3 4.1,1.9, body extent 0,0 3.2,1.6, height 1.35
MergenElektronik_Capacitors_Ceramics_SMDs_1206_S_NS [mm] "1206 Small - No Silkscreen"
  rect 0.8x1.6 smd: 1(0.2,0.8) 2(3,0.8)
  body extent 0,0 3.2,1.6, height 1.35
MergenElektronik_CircuitProtections_PTCs_0603_M [mm] "0603 Medium"
  rect 0.7x1 smd: 1(-0.7,0) 2(0.7,0)
  silkscreen extent -1.25,-0.7 1.25,0.7, body extent -0.8,-0.4 0.8,0.4, height 0.45
MergenElektronik_Connectors_Headers_1x4_Male [mil] "1x4 Male"
  round 70 hole 40: 1(0,0) 2(100,0) 3(200,0) 4(300,0)
  silkscreen extent -50,-50 350,50, body extent -50,-50 350,48, height 415
MergenElektronik_Diodes_BridgeRectifiers_TBS606 [mm] "TBS606"
  rect 1.5x1.5 smd: 1(7.6,8) 2(2.6,8) 3(7.6,-1) 4(2.6,-1)
  silkscreen extent 0,0 10.2,7, body extent 0,-1.45 10.2,8.45, height 1.95
"MergenElektronik_Diodes_SchottkyDiodes_DO-214AC (SMA)" [mm] "DO-214AC (SMA)"
  rect 1.5x1.5 smd: 1(-0.1,1.3) 2(4.3,1.3)
  silkscreen extent 0,0 5.1,3.1, body extent -0.4,0.01 4.79,2.6, height 2.44
MergenElektronik_Diodes_SchottkyDiodes_SOD-523 [mm] "SOD-523"
  rect 0.5x0.35 smd: 1(-0.2,0.4) 2(1.4,0.4)
  silkscreen extent 0,0 1.54,1.04, body extent -0.25,-0.04 1.45,0.84, height 0.46
MergenElektronik_Diodes_SingleDiodes_SOD-123F [mm] "SOD-123F"
  rect 0.7x1 smd: 1(-0.5,0.95) 2(3.3,0.95)
  silkscreen extent 0,0 3.15,2.15, body extent -0.5,0.1 3.3,1.9, height 1.02
MergenElektronik_FuseHolders_BladeType_3568 [mm] "3568"
  rrect75% 3x2.2 hole 1.8: 1(3.05,5.065) 1(3.05,1.665) 2(12.95,1.665) 2(12.95,5.065)
  silkscreen extent 0,0 16,6.73, body extent -0.1,0 15.9,6.73, height 7.36
MergenElektronik_Inductors_PowerInductors_SMDs_8x8x4mm_Shielded [mm] "8x8x4mm Shielded"
  rect 4x7 smd: 1(0,4) 2(8,4)
  Keep-Out Layer region: 2.2,0.4 5.8,0.4 5.8,7.6 2.2,7.6
  silkscreen extent 0,0 8,8, body extent 0,0 8,8, height 4
MergenElektronik_Inductors_PowerInductors_SMDs_1008_S_NS [mm] "1008 Small - No Silkscreen"
  rect 0.7x2 smd: 1(-1.016,0) 2(1.016,0)
  body extent -1.25,-1 1.25,1, height 1.6
MergenElektronik_Leds_SMDs_0603_S [mm] "0603 Small"
  rect 0.5x0.8 smd: 1(-0.6,0) 2(0.6,0)
  silkscreen extent -1.05,-0.6 1.32,0.69, body extent -0.8,-0.4 0.8,0.4, height 0.55
MergenElektronik_Leds_SMDs_0603_S_NS [mm] "0603 Small - No Silkscreen"
  rect 0.5x0.8 smd: 1(-0.6,0) 2(0.6,0)
  silkscreen extent 1.22,0.58 1.32,0.69, body extent -0.8,-0.4 0.8,0.4, height 0.55
MergenElektronik_Logics_GateDrivers_10VSON [mm] "10-VSON 3x3"
  rect 0.7x0.2 smd: 1(0,2.5) 2(0,2) 3(0,1.5) 4(0,1) 5(0,0.5) 6(3,0.5) 7(3,1) 8(3,1.5) 9(3,2) 10(3,2.5)
  round 0.5 hole 0.3: 9(1.1,1.5) 9(1.1,2.3) 9(1.1,0.7) 9(1.9,0.7) 9(1.9,1.5) 9(1.9,2.3)
  rect 1.65x2.6 smd: 9(1.5,1.5)
  rect 1.65x2.6 smd far side: 9(1.5,1.5)
  silkscreen extent 0,0 3,3, body extent 0,0 3,3, height 1
MergenElektronik_Microcontrollers_STMicroelectronics_UFQFPN-20 [mm] "UFQFPN-20"
  rect 0.6x0.25 smd: 1(0,2.5) 5(0,0.5) 11(3,0.5) 15(3,2.5)
  rect 0.8x0.25 smd: 2(0.1,2) 3(0.1,1.5) 4(0.1,1) 12(2.9,1) 13(2.9,1.5) 14(2.9,2)
  rect 0.25x0.6 smd: 6(0.5,0) 10(2.5,0) 16(2.5,3) 20(0.5,3)
  rect 0.25x0.8 smd: 7(1,0.1) 8(1.5,0.1) 9(2,0.1) 17(2,2.9) 18(1.5,2.9) 19(1,2.9)
  silkscreen extent -0.25,0 3,3.25, body extent 0,0 3,3, height 0.6
MergenElektronik_Oscillators_Crystals_2-SMD [mm] "2-SMD"
  rect 2x2.5 smd: 1(0.3,1.6) 2(4.7,1.6)
  silkscreen extent 0,0 5,3.2, body extent 0,0.1 5,3.3, height 1.35
MergenElektronik_Regulators_Linears_6-TDFN [mm] "6-TDFN"
  rect 0.6x0.45 smd: 1(0,2.45) 2(0,1.5) 3(0,0.55) 4(3,0.55) 5(3,1.5) 6(3,2.45)
  round 0.4 hole 0.3: 3(1.1,1.5) 3(1.1,2.3) 3(1.1,0.7) 3(1.9,0.7) 3(1.9,1.5) 3(1.9,2.3)
  rect 1.8x2.6 smd: 3(1.5,1.5)
  rect 1.8x2.6 smd far side: 3(1.5,1.5)
  silkscreen extent -0.35,0 3,3.35, body extent 0,0 3,3, height 0.8
MergenElektronik_Regulators_Linears_SOT223 [mm] "SOT223"
  rect 1x2 smd: 1(0.95,-1.3) 2(3.25,-1.3) 3(5.55,-1.3)
  rect 3.8x2 smd: 2(3.25,4.75)
  silkscreen extent 0,0 6.5,3.5, body extent 0.1,-1.6 6.4,5.1, height 1.8
MergenElektronik_Relays_PowerRelays_ALQ105 [mm] "ALQ105"
  round 1.5 hole 1: C1(1.19,1.111) C2(8.81,1.11)
  rrect70% 2.5x1.5 hole 1 copper offset 0.5,0: COM(1.11,16.35)
  rrect70% 1.5x2.5 hole 1 copper offset 0,0.5: NC(8.81,11.27)
  rrect70% 1.5x2.5 hole 1 copper offset 0,-0.5: NO(8.81,18.89)
  silkscreen extent 0,0 10,20, body extent 0,0 10,20, height 16
MergenElektronik_Resistors_ChipResistors_0603_S [mm] "0603 Small"
  rect 0.5x0.8 smd: 1(-0.6,0) 2(0.6,0)
  silkscreen extent -1.05,-0.6 1.05,0.6, body extent -0.8,-0.4 0.8,0.4, height 0.45
MergenElektronik_Resistors_ChipResistors_0603_S_NS [mm] "0603 Small - No Silkscreen"
  rect 0.5x0.8 smd: 1(-0.6,0) 2(0.6,0)
  body extent -0.8,-0.4 0.8,0.4, height 0.45
MergenElektronik_Screens_LCDs_16x2Module [mm] "16*2 LCD Module with Allen"
  silkscreen extent 0,0 80,36, body extent 0,0 80.67,36.65, height 13.59
MergenElektronik_Sensors_CurrentSensors_ACS711KEXLT-31AB-T [mm] "ACS711KEXLT-31AB-T"
  rect 1.5x0.6 smd: 1(-0.1,2.1) 2(-0.1,0.9)
  rect 0.2x0.6 smd: 3(1.75,-0.1) 4(2.25,-0.1) 6(2.25,3.1) 7(1.75,3.1)
  rect 0.6x0.2 smd: 5(3.1,0.75) 5(3.1,1.25) 5(3.1,1.75) 5(3.1,2.25)
  Keep-Out Layer region: 2.6,-1 3.5,-1 3.5,-0.5 2.6,-0.5
  Keep-Out Layer region: 2.6,-0.5 3.5,-0.5 3.5,0 2.6,0
  Keep-Out Layer region: 3,0 3.5,0 3.5,0.4 3,0.4
  Keep-Out Layer region: 3,2.6 3.5,2.6 3.5,3 3,3
  Keep-Out Layer region: 2.6,3 3.5,3 3.5,3.5 2.6,3.5
  Keep-Out Layer region: 0,3 1.4,3 1.4,4 0,4
  Keep-Out Layer region: 3.5,2.6 4,2.6 4,3.5 3.5,3.5
  Keep-Out Layer region: 2.6,3.5 4,3.5 4,4 2.6,4
  Keep-Out Layer region: 3.5,-1 4,-1 4,0.4 3.5,0.4
  Keep-Out Layer region: 0,0.396 0.9,0.396 0.9,2.6 0,2.6 0,3 1.4,3 1.4,2.6 2.6,2.599 2.6,3 3,3 3,2.6 2.6,2.6 2.6,1.976 2.6,0.396 3,0.396 3,0 2.6,0 2.6,0.404 1.4,0.396 1.4,-1 0,-1
  silkscreen extent -0.36,0 3,3.36, body extent 0,0 3,3, height 0.8
MergenElektronik_Switches_TactileSwitches_PTS526 [mm] "PTS526 1.5mm Height"
  rect 1.6x0.7 smd: 1(0,4.45) 1(5.2,4.45) 2(0,0.75) 2(5.2,0.75)
  silkscreen extent 0,0 5.2,5.2, body extent -0.55,-0.1 5.75,5.3, height 2
MergenElektronik_Switches_TactileSwitches_PTS815 [mm] "PTS815"
  rect 1x0.7 smd: 1(0,2.675) 1(4.2,2.675) 2(0,0.525) 2(4.2,0.525)
  silkscreen extent 0,0 4.2,3.2, body extent -0.25,-0.05 4.45,3.25, height 2.5
MergenElektronik_Transistors_Mosfets_SOT-23 [mm] "SOT-23"
  rect 0.6x0.7 smd: 1(0.5,-0.6) 2(2.4,-0.6) 3(1.45,1.9)
  silkscreen extent 0,0 2.9,1.3, body extent -0.05,-0.65 2.95,1.85, height 1.1
MergenElektronik_Transistors_Mosfets_TO-252-3(DPAK) [mm] "TO-252-3 DPAK"
  rect 1.3x3.4 smd: 1(1.05,-1.95) 3(5.65,-1.95)
  round 0.8 hole 0.5: 2(1.6,6.7) 2(1.6,5.5) 2(1.6,4.3) 2(1.6,3.1) 2(3.4,6.7) 2(3.4,3.1) 2(3.4,4.3) 2(3.4,5.5) 2(5.2,6.7) 2(5.2,3.1) 2(5.2,4.3) 2(5.2,5.5)
  rect 5.3x5.5 smd: 2(3.365,4.9)
  rect 5.3x5.5 smd far side: 2(3.365,4.9)
  silkscreen extent 0,0 6.73,6.22, body extent 0.04,-2.81 6.76,7.61, height 2.39